# Altium PCB Copy of Auto_USBC_15W_TPS25833Q1.PcbDoc (part 1 of 2)
Units mm, origin at the board's own origin, x right, y up, seen from the top; angles counter-clockwise.
Board outline 23 x 48.5 mm, 4 copper layers (L1_Top, L2_GND, L3_GND, L4_Bottom), stack 1.564 mm thick; 40 components, 24 nets, 137 pads, 9 vias.
Unrouted connection lines stored in the file: 104.
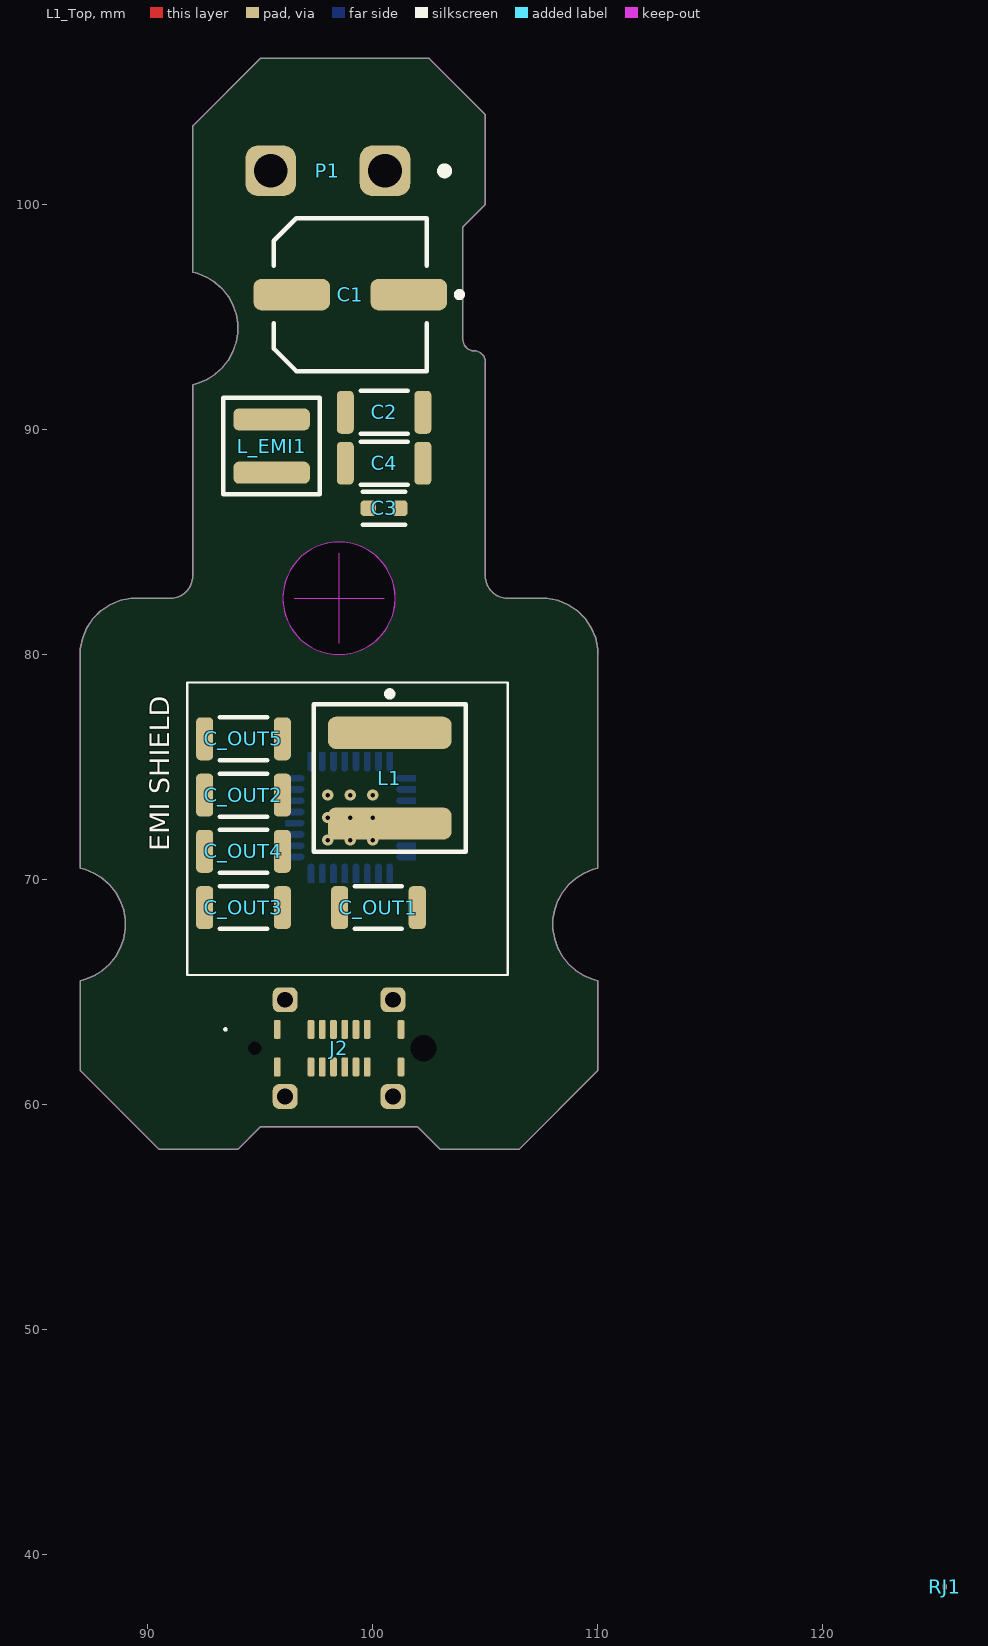
[diagram p0: L1_Top view]
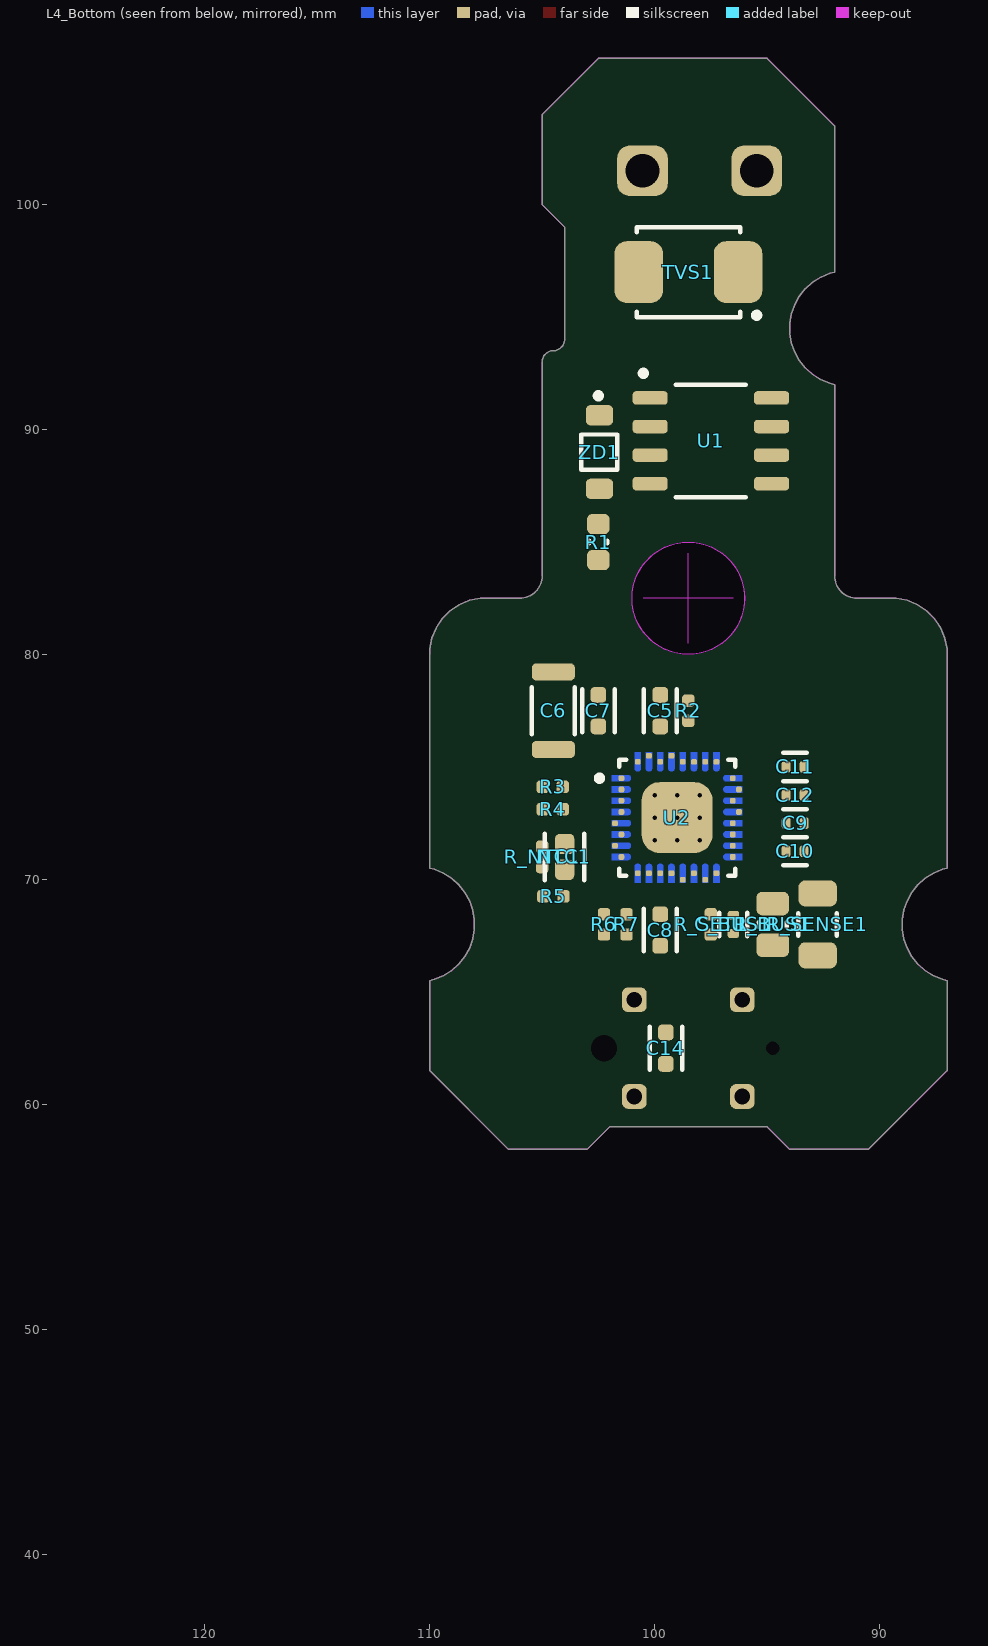
[diagram p1: L4_Bottom view, seen from below]
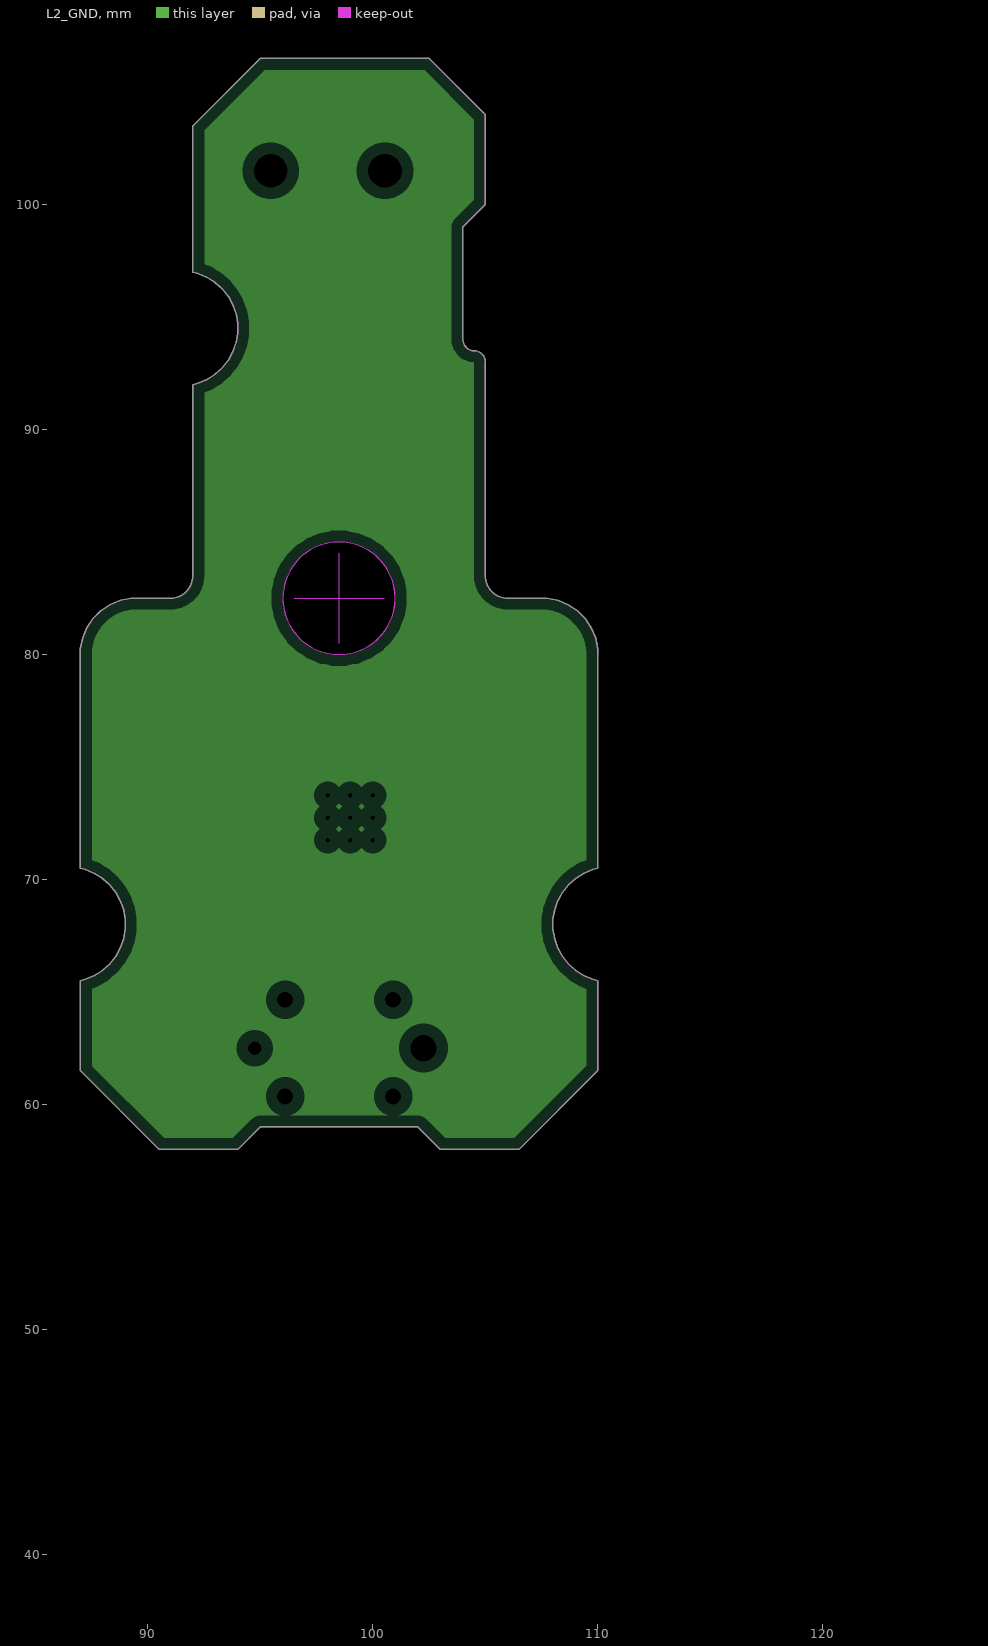
[diagram p2: L2_GND, clearances drawn from the general rule]
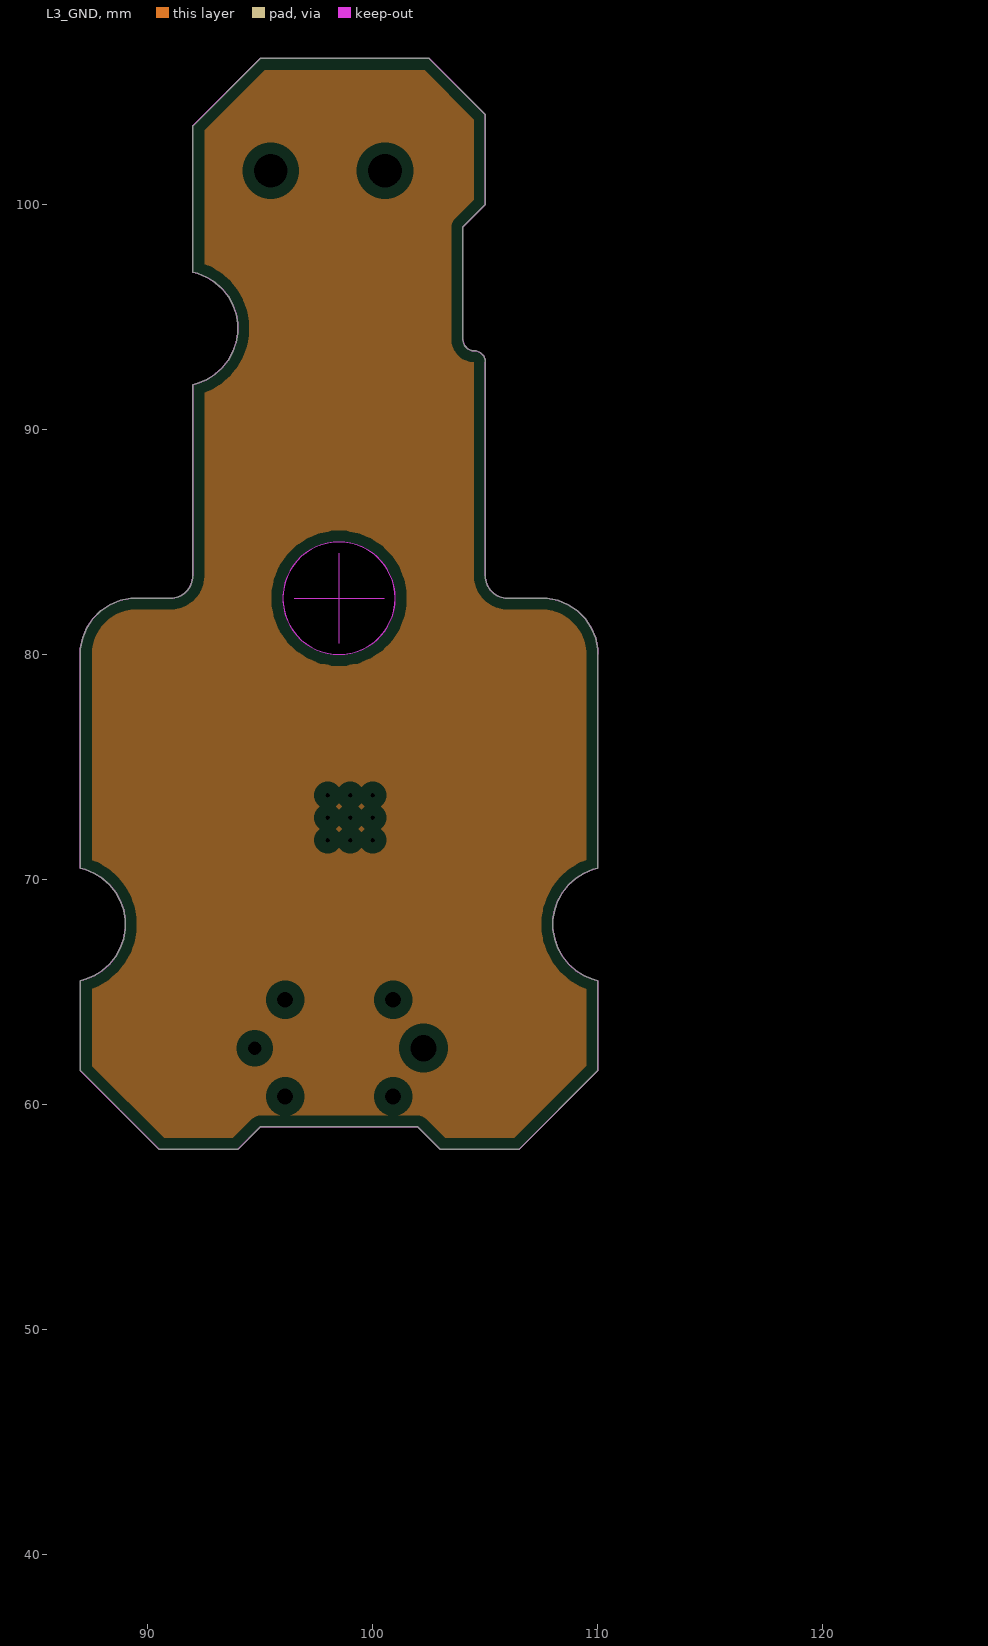
[diagram p3: L3_GND, clearances drawn from the general rule]

## Layer stack, top to bottom
Top Solder: solder mask 0.0305, Solder Resist, Dk 3.8
L1_Top: signal copper 0.035
PP_3313_1: prepreg 0.0994, 3313, Dk 4.1
L2_GND: plane copper 0.0152
Core_1: core 1.265, NP-155F, Dk 4.6
L3_GND: plane copper 0.0152
PP_3313_2: prepreg 0.0994, 3313, Dk 4.1
L4_Bottom: signal copper 0.035
Bottom Solder: solder mask 0.0305, Solder Resist, Dk 3.8

## Board outline
87,61.5 87,65.5 87.209,65.556 87.608,65.72 87.974,65.949 88.296,66.236 88.566,66.573 88.775,66.951 88.918,67.358 88.991,67.784 88.991,68.216 88.918,68.641 88.775,69.049 88.566,69.426 88.296,69.764 87.974,70.051 87.608,70.279 87.209,70.444 87,70.5 87,80 87,80.246 87.096,80.729 87.285,81.184 87.558,81.594 87.906,81.942 88.316,82.215 88.771,82.404 89.254,82.5 89.5,82.5 91,82.5 91.098,82.505 91.29,82.543 91.471,82.618 91.634,82.727 91.773,82.866 91.882,83.029 91.957,83.21 91.995,83.402 92,83.5 92,92 92.209,92.056 92.608,92.22 92.974,92.449 93.296,92.736 93.566,93.073 93.775,93.451 93.918,93.858 93.991,94.284 93.991,94.716 93.918,95.141 93.775,95.549 93.566,95.926 93.296,96.264 92.974,96.551 92.608,96.779 92.209,96.944 92,97 92,103.5 95,106.5 102.5,106.5 105,104 105,100 104,99 104,94 104.01,93.902 104.084,93.722 104.222,93.584 104.402,93.51 104.5,93.5 104.599,93.5 104.783,93.424 104.924,93.283 105,93.099 105,93 105,83.5 105.005,83.402 105.043,83.21 105.118,83.029 105.227,82.866 105.366,82.727 105.529,82.618 105.71,82.543 105.902,82.505 106,82.5 107.5,82.5 107.746,82.5 108.229,82.404 108.684,82.215 109.094,81.942 109.442,81.594 109.715,81.184 109.904,80.729 110,80.246 110,80 110,70.5 109.791,70.444 109.392,70.28 109.026,70.051 108.703,69.764 108.434,69.427 108.224,69.049 108.082,68.642 108.009,68.216 108.009,67.784 108.082,67.359 108.224,66.951 108.434,66.573 108.703,66.236 109.026,65.949 109.392,65.72 109.791,65.556 110,65.5 110,61.5 106.5,58 103,58 102,59 95,59 94,58 90.5,58
cut-out: 96,82.5 ccw(c98.5,82.5) 98.5,80 ccw(c98.5,82.5) 101,82.5 ccw(c98.5,82.5) 98.5,85 ccw(c98.5,82.5)

## Design rules (kind name [scope] priority, off if disabled: settings)
Clearance [All] p1: gap=0.254 ignorepadtopadclearanceinfootprint=FALSE
PlaneClearance [All] p1: clearance=0.508
PlaneConnect [All] p1: planeconnectstyle=Relief reliefexpansion=0.508 reliefentries=4 reliefconductorwidth=0.254 reliefairgap=0.254
PolygonConnect [All] p1: connectstyle=Relief reliefconductorwidth=0.254 reliefentries=4 polygonreliefangle="90 Angle" airgapwidth=0.254
RoutingVias [All] p1: holewidth=0.711 width=1.27 viastyle="Through Hole" minholewidth=0.711 minwidth=1.27 maxholewidth=0.711 maxwidth=1.27
SolderMaskExpansion [All] p1: expansion=0.102 istentingtop=FALSE
Width [All] p1: maxlimit=0.254 minlimit=0.254 preferedwidth=0.254
28 further rules are at their usual default settings.

## Components (designator, comment, footprint, x,y, rotation, side; value= is the part's Value field where it differs from the comment)
C1 "EDH476M050S9HAA" FP-EDH476M050S9HAA-IPC_C 99,96 r180 top
C2 "CGA5L1X7R1H106K160AC" FP-CGA5L-0_3-0_1-IPC_B#1 100.5,90.766 r0 top
C3 "CGA3E2X7R1H104K080AA" FP-CGA3E-0_3-0_1-MFG#1 100.5,86.5 r0 top
C4 "CGA5L1X7R1H106K160AC" FP-CGA5L-0_3-0_1-IPC_B#1 100.5,88.5 r0 top
C5 "CGA3E2X7R1H104K080AA" FP-CGA3E-0_3-0_1-MFG#2 99.75,77.5 r90 bottom
C6 "CGA5L1X7R1H106K160AC" FP-CGA5L-0_3-0_1-IPC_B#2 104.5,77.5 r90 bottom
C7 "CGA3E2X7R1H104K080AA" FP-CGA3E-0_3-0_1-MFG#2 102.5,77.5 r90 bottom
C8 "CGA3E2X7R1H104K080AA" FP-CGA3E-0_3-0_1-MFG#2 99.75,67.75 r270 bottom
C9 "C1005X5R1E224M050BC" FP-CGA2B-MFG 93.75,72.5 r180 bottom value=220nF
C10 "C1005X5R1E224M050BC" FP-CGA2B-MFG 93.75,71.25 r180 bottom value=220nF
C11 "GRT155R61E225KE13D" FP-CGA2B-MFG 93.75,75 r180 bottom value=2.2µF
C12 "CGA2B3X7R1E104K050BB" FP-CGA2B-MFG 93.75,73.75 r180 bottom
C14 "CGA3E2X5R1A105K080AA" FP-CGA3E-0_3-0_1-MFG#2 99.5,62.5 r270 bottom
C_BUS1 "C1005X5R1E224M050BC" FP-CGA2B-MFG 96.5,68 r270 bottom value=220nF
C_OUT1 "GRT31CR61E226KE01L" FP-CGA5L-0_3-0_1-IPC_B#1 100.25,68.75 r0 top value=22µF
C_OUT2 "GRT31CR61E226KE01L" FP-CGA5L-0_3-0_1-IPC_B#1 94.25,73.75 r180 top value=22µF
C_OUT3 "GRT31CR61E226KE01L" FP-CGA5L-0_3-0_1-IPC_B#3 94.25,68.75 r180 top value=22µF
C_OUT4 "GRT31CR61E226KE01L" FP-CGA5L-0_3-0_1-IPC_B#1 94.25,71.25 r180 top value=22µF
C_OUT5 "GRT31CR61E226KE01L" FP-CGA5L-0_3-0_1-IPC_B#1 94.25,76.25 r180 top value=22µF
J2 "219320-0001" 2193200001 98.5,62.5 r0 top
L1 "XAL6060-103MEB" FP-XAL6060-MFG 100.75,74.5 r270 top
L_EMI1 "XAL4020-102MEC" FP-XAL4020-102MEC-MFG 95.5,89.266 r270 top value=1uH
NTC1 "NCU18WF104F6SRB" FP-NCU18-0_15-IPC_C 104,71 r270 bottom
P1 "638207122002" 638263122002 98,101.5 r180 top
R1 "100K 1% 0603(1608)" RESC0603(1608)_N 102.5,85 r90 bottom value=100kΩ
R2 "ERJ2GE0R00X" RESC1005X40X25NL05T05 98.5,77.5 r270 bottom
R3 "" RESC1005X40X25NL05T05 104.53,74.117 r0 bottom value=20kΩ
R4 "" RESC1005X40X25NL05T05 104.53,73.117 r180 bottom value=5kΩ
R5 "ERJ-2RKF4992X" RESC1005X40X25NL05T05 104.5,69.25 r180 bottom value=49.9kΩ
R6 "ERJ2GE0R00X" RESC1005X40X25NL05T05 102.25,68 r90 bottom
R7 "CRCW040211K8FKEE" RESC1005X40X25NL05T05 101.25,68 r90 bottom value=11.8kΩ
R_BUS1 "RK73B2ATTD101J" RESC2013X60X30NL20T20 94.75,68 r90 bottom value=100Ω
R_NTC1 "" RESC1005X40X25NL05T05 105,71 r270 bottom value=10kΩ
R_SENSE1 "CSR1206FK15L0" FP-CSR1206-IPC_B 92.75,68 r270 bottom
R_SET1 "CRCW0402301RFKED" RESC1005X40X25NL05T05 97.5,68 r90 bottom value=301Ω
RJ1 "Net Tie 0.6x1.4mm" SHORT10_8MIL-FP 125.425,38.556 r90 top net-tie
TVS1 "" ONSC-SMB-2-403A-03_H_V 98.5,97 r0 bottom
U1 "SQ4917CEY-T1_GE3" FP-C04-057-SN-MFG 97.5,89.5 r180 bottom
U2 "TPS25833QWRHBRQ1" FP-RHB0032D-MFG 99,72.75 r180 bottom
ZD1 "" ONSC-SOD-123-2-425-04_V 102.45,89 r270 bottom

## Footprints (in the part's own frame and the unit in brackets; to place one, negate y for a bottom-side part, rotate by r counter-clockwise, add the part's x,y. Pads: shape width x height; smd on the part's side, far side on the other; paste and mask are expansions set on the pad)
2193200001 [mm]
  rrect50% 0.3x0.85 smd paste+0: A1(-2.75,0.835) A4(-1.25,0.835) A5(-0.75,0.835) A6(-0.25,0.835) A7(0.25,0.835) A8(0.75,0.835) A9(1.25,0.835) A12(2.75,0.835) B1(2.75,-0.835) B4(1.25,-0.835) B5(0.75,-0.835) B6(0.25,-0.835) B7(-0.25,-0.835) B8(-0.75,-0.835) B9(-1.25,-0.835) B12(-2.75,-0.835)
  rrect50% 0.3x0.3 hole 0.6 unplated: MH1(-3.75,0)
  rrect50% 0.585x0.585 hole 1.17 unplated: MH2(3.75,0)
  rrect50% 1.1x1.1 hole 0.7: MH3(-2.4,2.15) MH4(2.4,2.15) MH5(2.4,-2.15) MH6(-2.4,-2.15)
  silkscreen extent -5.1,0.79 -5,0.88, body extent -4.46,-2.32 4.48,2.28, height 8.81
638263122002 [mm]
  rrect50% 2.25x2.25 hole 1.5: 1(-2.54,0) 2(2.54,0)
  silkscreen extent -5.27,-0.08 -5.11,0.08
FP-C04-057-SN-MFG [mm]
  rrect50% 1.55x0.6 smd: 1(-2.7,1.905) 2(-2.7,0.635) 3(-2.7,-0.635) 4(-2.7,-1.905) 5(2.7,-1.905) 6(2.7,-0.635) 7(2.7,0.635) 8(2.7,1.905)
  silkscreen extent -3.13,-2.5 1.55,3.12, body extent -3,-2.45 3,2.45, height 1.75
FP-CGA2B-MFG [mm]
  rrect50% 0.4x0.5 smd: 1(-0.4,0) 2(0.4,0)
  silkscreen extent -0.53,-0.63 0.53,0.63, body extent -0.5,-0.25 0.5,0.25, height 0.55
FP-CGA3E-0_3-0_1-MFG#1 [mm]
  rrect50% 0.7x0.7 smd paste+0: 1(-0.7,0) 2(0.7,0)
  silkscreen extent -0.95,-0.72 0.95,0.72, body extent -1.15,-0.65 1.15,0.65, height 0.25
FP-CGA3E-0_3-0_1-MFG#2 [mm]
  rrect50% 0.7x0.7 smd: 1(-0.7,0) 2(0.7,0)
  silkscreen extent -0.95,-0.72 0.95,0.72, body extent -0.8,-0.4 0.8,0.4, height 1.1
FP-CGA5L-0_3-0_1-IPC_B#1 [mm]
  rrect50% 0.756x1.906 smd paste+0: 1(-1.725,0) 2(1.725,0)
  silkscreen extent -1.05,-0.95 1.05,0.95, body extent -2.35,-1.2 2.35,1.2, height 0.25
FP-CGA5L-0_3-0_1-IPC_B#2 [mm]
  rrect50% 0.756x1.906 smd: 1(-1.725,0) 2(1.725,0)
  silkscreen extent -1.05,-0.95 1.05,0.95, body extent -1.6,-0.76 1.6,0.84, height 1.9
FP-CGA5L-0_3-0_1-IPC_B#3 [mm]
  rrect50% 0.756x1.906 smd paste+0: 1(-1.725,0)
  rrect50% 0.756x1.906 smd: 2(1.725,0)
  silkscreen extent -1.05,-0.95 1.05,0.95, body extent -2.35,-1.2 2.35,1.2, height 0.25
FP-CSR1206-IPC_B [mil]
  rrect50% 45.5x67.25 smd: 1(-54.18,0) 2(54.18,0)
  silkscreen extent -20,-34 20,34, body extent -60,-31 60,31, height 26
FP-EDH476M050S9HAA-IPC_C [mm]
  rrect50% 3.4x1.4 smd paste+0: 1(-2.6,0) 2(2.6,0)
  silkscreen extent -4.98,-3.4 3.4,3.4, body extent -4.55,-3.65 4.55,3.65, height 0.25
FP-NCU18-0_15-IPC_C [mm]
  rrect50% 0.906x0.858 smd: 1(-0.576,0) 2(0.576,0)
  silkscreen extent -1.03,-0.87 1.03,0.87, body extent -0.8,-0.4 0.8,0.4, height 0.95
FP-RHB0032D-MFG [mm]
  rrect50% 0.252x0.252 smd: 1(-2.475,1.75) 2(-2.475,1.25) 3(-2.475,0.75) 4(-2.475,0.25) 5(-2.76,-0.25) 6(-2.475,-0.75) 7(-2.76,-1.25) 8(-2.475,-1.75) 9(-1.75,-2.475) 10(-1.25,-2.475) 11(-0.75,-2.475) 12(-0.25,-2.475) 13(0.25,-2.76) 14(0.75,-2.475) 15(1.25,-2.76) 16(1.75,-2.475) 17(2.475,-1.75) 18(2.475,-1.25) 19(2.475,-0.75) 20(2.475,-0.25) 21(2.75,0.25) 22(2.475,0.75) 23(2.75,1.25) 24(2.475,1.75) 25(1.75,2.475) 26(1.25,2.475) 27(0.75,2.475) 28(0.25,2.475) 29(-0.25,2.75) 30(-0.75,2.475) 31(-1.25,2.75) 32(-1.75,2.475)
  rrect50% 3.15x3.15 smd: 33(0,0)
  L1_Top region: -2.9,1.89 -2.19,1.89 -2.136,1.879 -2.091,1.849 -2.061,1.804 -2.05,1.75 -2.05,1.75 -2.061,1.696 -2.091,1.651 -2.136,1.621 -2.19,1.61 -2.19,1.61 -2.9,1.61
  L1_Top region: -2.9,1.39 -2.19,1.39 -2.136,1.379 -2.091,1.349 -2.061,1.304 -2.05,1.25 -2.05,1.25 -2.061,1.196 -2.091,1.151 -2.136,1.121 -2.19,1.11 -2.19,1.11 -2.9,1.11
  L1_Top region: -2.9,0.89 -2.19,0.89 -2.136,0.879 -2.091,0.849 -2.061,0.804 -2.05,0.75 -2.05,0.75 -2.061,0.696 -2.091,0.651 -2.136,0.621 -2.19,0.61 -2.19,0.61 -2.9,0.61
  L1_Top region: -2.9,0.39 -2.19,0.39 -2.136,0.379 -2.091,0.349 -2.061,0.304 -2.05,0.25 -2.05,0.25 -2.061,0.196 -2.091,0.151 -2.136,0.121 -2.19,0.11 -2.19,0.11 -2.9,0.11
  L1_Top region: -2.9,-0.11 -2.19,-0.11 -2.136,-0.121 -2.091,-0.151 -2.061,-0.196 -2.05,-0.25 -2.05,-0.25 -2.061,-0.304 -2.091,-0.349 -2.136,-0.379 -2.19,-0.39 -2.19,-0.39 -2.9,-0.39
  L1_Top region: -2.9,-0.61 -2.19,-0.61 -2.136,-0.621 -2.091,-0.651 -2.061,-0.696 -2.05,-0.75 -2.05,-0.75 -2.061,-0.804 -2.091,-0.849 -2.136,-0.879 -2.19,-0.89 -2.19,-0.89 -2.9,-0.89
  L1_Top region: -2.9,-1.11 -2.19,-1.11 -2.136,-1.121 -2.091,-1.151 -2.061,-1.196 -2.05,-1.25 -2.05,-1.25 -2.061,-1.304 -2.091,-1.349 -2.136,-1.379 -2.19,-1.39 -2.19,-1.39 -2.9,-1.39
  L1_Top region: -2.9,-1.61 -2.19,-1.61 -2.136,-1.621 -2.091,-1.651 -2.061,-1.696 -2.05,-1.75 -2.05,-1.75 -2.061,-1.804 -2.091,-1.849 -2.136,-1.879 -2.19,-1.89 -2.19,-1.89 -2.9,-1.89
  L1_Top region: 2.9,-1.89 2.19,-1.89 2.136,-1.879 2.091,-1.849 2.061,-1.804 2.05,-1.75 2.05,-1.75 2.061,-1.696 2.091,-1.651 2.136,-1.621 2.19,-1.61 2.19,-1.61 2.9,-1.61
  L1_Top region: 2.9,-1.39 2.19,-1.39 2.136,-1.379 2.091,-1.349 2.061,-1.304 2.05,-1.25 2.05,-1.25 2.061,-1.196 2.091,-1.151 2.136,-1.121 2.19,-1.11 2.19,-1.11 2.9,-1.11
  L1_Top region: 2.9,-0.89 2.19,-0.89 2.136,-0.879 2.091,-0.849 2.061,-0.804 2.05,-0.75 2.05,-0.75 2.061,-0.696 2.091,-0.651 2.136,-0.621 2.19,-0.61 2.19,-0.61 2.9,-0.61
  L1_Top region: 2.9,-0.39 2.19,-0.39 2.136,-0.379 2.091,-0.349 2.061,-0.304 2.05,-0.25 2.05,-0.25 2.061,-0.196 2.091,-0.151 2.136,-0.121 2.19,-0.11 2.19,-0.11 2.9,-0.11
  L1_Top region: 2.9,0.11 2.19,0.11 2.136,0.121 2.091,0.151 2.061,0.196 2.05,0.25 2.05,0.25 2.061,0.304 2.091,0.349 2.136,0.379 2.19,0.39 2.19,0.39 2.9,0.39
  L1_Top region: 2.9,0.61 2.19,0.61 2.136,0.621 2.091,0.651 2.061,0.696 2.05,0.75 2.05,0.75 2.061,0.804 2.091,0.849 2.136,0.879 2.19,0.89 2.19,0.89 2.9,0.89
  L1_Top region: 2.9,1.11 2.19,1.11 2.136,1.121 2.091,1.151 2.061,1.196 2.05,1.25 2.05,1.25 2.061,1.304 2.091,1.349 2.136,1.379 2.19,1.39 2.19,1.39 2.9,1.39
  L1_Top region: 2.9,1.61 2.19,1.61 2.136,1.621 2.091,1.651 2.061,1.696 2.05,1.75 2.05,1.75 2.061,1.804 2.091,1.849 2.136,1.879 2.19,1.89 2.19,1.89 2.9,1.89
  L1_Top region: -1.89,-2.9 -1.89,-2.19 -1.879,-2.136 -1.849,-2.091 -1.804,-2.061 -1.75,-2.05 -1.75,-2.05 -1.696,-2.061 -1.651,-2.091 -1.621,-2.136 -1.61,-2.19 -1.61,-2.19 -1.61,-2.9
  L1_Top region: -1.39,-2.9 -1.39,-2.19 -1.379,-2.136 -1.349,-2.091 -1.304,-2.061 -1.25,-2.05 -1.25,-2.05 -1.196,-2.061 -1.151,-2.091 -1.121,-2.136 -1.11,-2.19 -1.11,-2.19 -1.11,-2.9
  L1_Top region: -0.89,-2.9 -0.89,-2.19 -0.879,-2.136 -0.849,-2.091 -0.804,-2.061 -0.75,-2.05 -0.75,-2.05 -0.696,-2.061 -0.651,-2.091 -0.621,-2.136 -0.61,-2.19 -0.61,-2.19 -0.61,-2.9
  L1_Top region: -0.39,-2.9 -0.39,-2.19 -0.379,-2.136 -0.349,-2.091 -0.304,-2.061 -0.25,-2.05 -0.25,-2.05 -0.196,-2.061 -0.151,-2.091 -0.121,-2.136 -0.11,-2.19 -0.11,-2.19 -0.11,-2.9
  L1_Top region: 0.11,-2.9 0.11,-2.19 0.121,-2.136 0.151,-2.091 0.196,-2.061 0.25,-2.05 0.25,-2.05 0.304,-2.061 0.349,-2.091 0.379,-2.136 0.39,-2.19 0.39,-2.19 0.39,-2.9
  L1_Top region: 0.61,-2.9 0.61,-2.19 0.621,-2.136 0.651,-2.091 0.696,-2.061 0.75,-2.05 0.75,-2.05 0.804,-2.061 0.849,-2.091 0.879,-2.136 0.89,-2.19 0.89,-2.19 0.89,-2.9
  L1_Top region: 1.11,-2.9 1.11,-2.19 1.121,-2.136 1.151,-2.091 1.196,-2.061 1.25,-2.05 1.25,-2.05 1.304,-2.061 1.349,-2.091 1.379,-2.136 1.39,-2.19 1.39,-2.19 1.39,-2.9
  L1_Top region: 1.61,-2.9 1.61,-2.19 1.621,-2.136 1.651,-2.091 1.696,-2.061 1.75,-2.05 1.75,-2.05 1.804,-2.061 1.849,-2.091 1.879,-2.136 1.89,-2.19 1.89,-2.19 1.89,-2.9
  L1_Top region: 1.89,2.9 1.89,2.19 1.879,2.136 1.849,2.091 1.804,2.061 1.75,2.05 1.75,2.05 1.696,2.061 1.651,2.091 1.621,2.136 1.61,2.19 1.61,2.19 1.61,2.9
  L1_Top region: 1.39,2.9 1.39,2.19 1.379,2.136 1.349,2.091 1.304,2.061 1.25,2.05 1.25,2.05 1.196,2.061 1.151,2.091 1.121,2.136 1.11,2.19 1.11,2.19 1.11,2.9
  L1_Top region: 0.89,2.9 0.89,2.19 0.879,2.136 0.849,2.091 0.804,2.061 0.75,2.05 0.75,2.05 0.696,2.061 0.651,2.091 0.621,2.136 0.61,2.19 0.61,2.19 0.61,2.9
  L1_Top region: 0.39,2.9 0.39,2.19 0.379,2.136 0.349,2.091 0.304,2.061 0.25,2.05 0.25,2.05 0.196,2.061 0.151,2.091 0.121,2.136 0.11,2.19 0.11,2.19 0.11,2.9
  L1_Top region: -0.11,2.9 -0.11,2.19 -0.121,2.136 -0.151,2.091 -0.196,2.061 -0.25,2.05 -0.25,2.05 -0.304,2.061 -0.349,2.091 -0.379,2.136 -0.39,2.19 -0.39,2.19 -0.39,2.9
  L1_Top region: -0.61,2.9 -0.61,2.19 -0.621,2.136 -0.651,2.091 -0.696,2.061 -0.75,2.05 -0.75,2.05 -0.804,2.061 -0.849,2.091 -0.879,2.136 -0.89,2.19 -0.89,2.19 -0.89,2.9
  L1_Top region: -1.11,2.9 -1.11,2.19 -1.121,2.136 -1.151,2.091 -1.196,2.061 -1.25,2.05 -1.25,2.05 -1.304,2.061 -1.349,2.091 -1.379,2.136 -1.39,2.19 -1.39,2.19 -1.39,2.9
  L1_Top region: -1.61,2.9 -1.61,2.19 -1.621,2.136 -1.651,2.091 -1.696,2.061 -1.75,2.05 -1.75,2.05 -1.804,2.061 -1.849,2.091 -1.879,2.136 -1.89,2.19 -1.89,2.19 -1.89,2.9
  silkscreen extent -3.58,-2.58 2.58,2.58, body extent -2.5,-2.5 2.5,2.5, height 1
FP-XAL4020-102MEC-MFG [mm]
  rrect50% 0.98x3.4 smd paste+0: 1(-1.185,0) 2(1.185,0)
  silkscreen extent -2.15,-2.15 2.15,2.15, body extent -2.25,-2.25 2.25,2.25, height 0.25
FP-XAL6060-MFG [mm]
  rrect50% 1.43x5.5 smd paste+0: 1(-2.02,0) 2(2.02,0)
  silkscreen extent -3.87,-3.38 3.28,3.38, body extent -3.38,-3.48 3.38,3.48, height 0.25
ONSC-SMB-2-403A-03_H_V [mm] "Molded, 2-Leads, Body 4.6x3.95mm"
  rrect50% 2.159x2.743 smd: 1(-2.21,0) 2(2.21,0)
  silkscreen extent -3.16,-2 2.3,2.05, body extent -2.3,-1.97 2.3,1.97, height 2.42
ONSC-SOD-123-2-425-04_V [mm] "SOD, 2-Leads, Body 2.69x1.6mm"
  rrect50% 0.91x1.22 smd: 1(-1.635,0) 2(1.635,0)
  silkscreen extent -2.62,-0.8 0.78,0.8, body extent -1.35,-0.8 1.35,0.8, height 1.35
RESC0603(1608)_N [mm] "Chip Resistor, Body 1.6x0.8mm, IPC Medium Density"
  rrect50% 0.9x1 smd: 1(-0.8,0) 2(0.8,0)
  silkscreen extent -0.05,-0.4 0.05,0.4, body extent -0.85,-0.47 0.85,0.47, height 0.6
RESC1005X40X25NL05T05 [mm] "Chip Resistor, 2-Leads, Body 1.05x0.55mm, IPC Medium Density"
  rrect50% 0.55x0.55 smd: 1(-0.45,0) 2(0.45,0)
  body extent -0.53,-0.28 0.53,0.28, height 0.4
RESC2013X60X30NL20T20 [mm] "Chip Resistor, 2-Leads, Body 2.00x1.25mm, IPC Medium Density"
  rrect50% 1.05x1.45 smd: 1(-0.925,0) 2(0.925,0)
  silkscreen extent -0.1,-0.63 0.1,0.63, body extent -1.1,-0.72 1.1,0.72, height 0.6
SHORT10_8MIL-FP [mil]
  rrect50% 8x8 smd paste-39.37: 1(-1,0) 2(1,0)

## Part data
C1: library part CMP-03015-000011-1, "CAP ALUM 47UF 20% 50V SMD", Capacitance=47uF, RoHS Compliant=Yes
C2 C4 C6: library part CMP-08246-001891-1, "Cap Ceramic 10uF 50V X7R 10% Pad SMD 1206 +125°C Automotive T/R", Capacitance=10uF, Case Code (Imperial)=1206, Case Code (Metric)=3216, Max Operating Temperature=125°C, Min Operating Temperature=-55°C, Ratings=AEC-Q200, Tolerance=10%, Voltage Rating=50V, Case/Package=1206, Mount="Surface Mount", Packaging="Tape and Reel"
C3 C5 C7 C8: library part CMP-2000-07546-2, "Cap Ceramic 100nF 50V X7R 10% Pad SMD 0603 +125°C Automotive T/R", Capacitance=100nF, Case Code (Imperial)=0603, Case Code (Metric)=1608, Dielectric=X7R, Max Operating Temperature=125°C, Min Operating Temperature=-55°C, Package Quantity=1, Ratings=AEC-Q200, Tolerance=10%, Voltage=50V, Case/Package=0603, Composition=Ceramic, Depth=0.8mm, Height=0.8mm, Lead Free="Lead Free", Length=1.6mm, Mount="Surface Mount", Packaging="Tape and Reel", Radiation Hardening=No, REACH SVHC="No SVHC", Termination=SMD/SMT, Thickness=0.035inch, Voltage Rating=50V, Voltage Rating (DC)=50V, Weight=7.1E-05oz, Width=0.8mm
C9 C10 C_BUS1: library part CMP-2000-06086-2, "25V 220nF X5R 卤20% 0402 Multilayer Ceramic Capacitors MLCC - SMD/SMT ROHS", Case Code (Imperial)=0402, Case Code (Metric)=1005, Dielectric=X5R, Dielectric Material=Ceramic, Manufacturer=TDK, Manufacturer Lifecycle Status="PRODUCTION (NOT RECOMMENDED FOR NEW DESIGN)", Max Operating Temperature=85°C, Min Operating Temperature=-55°C, Tolerance=20%, Voltage Rating=25V, Case/Package=0402, Category="Ceramic Capacitors", China RoHS=Compliant, ComponentLink1Description=https://datasheet.octopart.com:443/C1005X5R1E224M050BC-TDK-datasheet-175423548.pdf?src-supplier=IHS, ComponentLink1URL=https://datasheet.octopart.com:443/C1005X5R1E224M050BC-TDK-datasheet-175423548.pdf?src-supplier=IHS, ComponentLink2Description=https://datasheet.octopart.com:443/C1005X5R1E224M050BC-TDK-datasheet-151546523.pdf?src-supplier=TDK, ComponentLink2URL=https://datasheet.octopart.com:443/C1005X5R1E224M050BC-TDK-datasheet-151546523.pdf?src-supplier=TDK, ComponentLink3Description=https://datasheet.octopart.com/C1005X5R1E224M050BC-TDK-datasheet-41194876.pdf, ComponentLink3URL=https://datasheet.octopart.com/C1005X5R1E224M050BC-TDK-datasheet-41194876.pdf, ComponentLink4Description=https://datasheet.octopart.com/C-Series-Ceramic-Chip-Capacitors-TDK-datasheet-family-84.pdf, ComponentLink4URL=https://datasheet.octopart.com/C-Series-Ceramic-Chip-Capacitors-TDK-datasheet-family-84.pdf, ComponentLink5Description=https://datasheet.octopart.com:443/C1005X5R1E224M050BC-TDK-datasheet-82475248.pdf?src-supplier=Newark, ComponentLink5URL=https://datasheet.octopart.com:443/C1005X5R1E224M050BC-TDK-datasheet-82475248.pdf?src-supplier=Newark, ComponentLink6Description=https://datasheet.octopart.com:443/C1005X5R1E224M050BC-TDK-datasheet-13444418.pdf?src-supplier=Future+Electronics, ComponentLink6URL=https://datasheet.octopart.com:443/C1005X5R1E224M050BC-TDK-datasheet-13444418.pdf?src-supplier=Future+Electronics, ComponentLink7Description=https://datasheet.octopart.com:443/C1005X5R1E224M050BC-TDK-datasheet-17817446.pdf?src-supplier=Future+Electronics, ComponentLink7URL=https://datasheet.octopart.com:443/C1005X5R1E224M050BC-TDK-datasheet-17817446.pdf?src-supplier=Future+Electronics, ComponentLink8Description=https://datasheet.octopart.com:443/C1005X5R1E224M050BC-TDK-datasheet-10921857.pdf?src-supplier=Electro+Sonic, ComponentLink8URL=https://datasheet.octopart.com:443/C1005X5R1E224M050BC-TDK-datasheet-10921857.pdf?src-supplier=Electro+Sonic, ComponentLink9Description=http://sigma.octopart.com:80/rohs_certificate/C-Series-Ceramic-Chip-Capacitors-TDK-family-108.pdf?src-supplier=Compliance+Statements, ComponentLink9URL=http://sigma.octopart.com:80/rohs_certificate/C-Series-Ceramic-Chip-Capacitors-TDK-family-108.pdf?src-supplier=Compliance+Statements, Composition=Ceramic, Depth=500µm, Export Control Classification Number (ECCN) Code=EAR99, Harmonized Tariff Schedule (HTS) Code=8532.24.00.20, Height=500µm, Introduction Date=2012-08-21, Lead Free="Lead Free", Length=1mm, Lifecycle Status=NRND, Manufacturer Part Number=C1005X5R1E224M050BC, Material=Ceramic, Max Length=1.05mm, Max Width=550µm, Min Length=950µm, Min Width=450µm, Mounting Technology="Surface Mount", Number of Terminals=2, Pricing="10000=0.0212 (USD)", REACH SVHC=Unaffected, RoHS=Compliant, Supplier=Avnet, Supplier Part Number=C1005X5R1E224M050BC, Termination=SMD/SMT, Voltage Rating (DC)=25V, Weight=652.039032µg, Width=500µm
C11: library part CMP-2000-06086-2, "25V 2.2uF X5R ±10% 0402 Multilayer Ceramic Capacitors MLCC - SMD/SMT ROHS", Case Code (Imperial)=0402, Case Code (Metric)=1005, Dielectric=X5R, Dielectric Material=Ceramic, Manufacturer=Murata, Manufacturer Lifecycle Status="IN PRODUCTION", Max Operating Temperature=85°C, Min Operating Temperature=-55°C, Ratings=AEC-Q200, Tolerance=10%, Voltage Rating=25V, Case/Package=0402, Category="Ceramic Capacitors", ComponentLink1Description=https://datasheet.octopart.com:443/GRT155R61E225KE13D-Murata-datasheet-149523572.pdf?src-supplier=Farnell, ComponentLink1URL=https://datasheet.octopart.com:443/GRT155R61E225KE13D-Murata-datasheet-149523572.pdf?src-supplier=Farnell, ComponentLink2Description=https://datasheet.octopart.com:443/GRT155R61E225KE13D-Murata-datasheet-67697706.pdf?src-supplier=Newark, ComponentLink2URL=https://datasheet.octopart.com:443/GRT155R61E225KE13D-Murata-datasheet-67697706.pdf?src-supplier=Newark, ComponentLink3Description=https://datasheet.octopart.com:443/GRT155R61E225KE13D-Murata-datasheet-141283924.pdf?src-supplier=Geoflip, ComponentLink3URL=https://datasheet.octopart.com:443/GRT155R61E225KE13D-Murata-datasheet-141283924.pdf?src-supplier=Geoflip, ComponentLink4Description=https://datasheet.octopart.com:443/GRT155R61E225KE13D-Murata-datasheet-178522875.pdf?src-supplier=Arrow.cn, ComponentLink4URL=https://datasheet.octopart.com:443/GRT155R61E225KE13D-Murata-datasheet-178522875.pdf?src-supplier=Arrow.cn, ComponentLink5Description=https://datasheet.octopart.com:443/GRT155R61E225KE13D-Murata-datasheet-165579666.pdf?src-supplier=TME, ComponentLink5URL=https://datasheet.octopart.com:443/GRT155R61E225KE13D-Murata-datasheet-165579666.pdf?src-supplier=TME, ComponentLink6Description=https://datasheet.octopart.com:443/GRT155R61E225KE13D-Murata-datasheet-140711002.pdf?src-supplier=Ciiva, ComponentLink6URL=https://datasheet.octopart.com:443/GRT155R61E225KE13D-Murata-datasheet-140711002.pdf?src-supplier=Ciiva, ComponentLink7Description=https://datasheet.octopart.com:443/GRT155R61E225KE13D-Murata-datasheet-138748731.pdf?src-supplier=Ciiva, ComponentLink7URL=https://datasheet.octopart.com:443/GRT155R61E225KE13D-Murata-datasheet-138748731.pdf?src-supplier=Ciiva, ComponentLink8Description=https://datasheet.octopart.com:443/GRT155R61E225KE13D-Murata-datasheet-82944872.pdf?src-supplier=Future+Electronics, ComponentLink8URL=https://datasheet.octopart.com:443/GRT155R61E225KE13D-Murata-datasheet-82944872.pdf?src-supplier=Future+Electronics, ComponentLink9Description=http://sigma.octopart.com:80/reach_statement/Murata-company-16.pdf?src-supplier=Compliance+Statements, ComponentLink9URL=http://sigma.octopart.com:80/reach_statement/Murata-company-16.pdf?src-supplier=Compliance+Statements, Export Control Classification Number (ECCN) Code=EAR99, Harmonized Tariff Schedule (HTS) Code=8532.24.00.20, Height=500µm, Introduction Date=2016-01-27, Length=1mm, Lifecycle Status=Production, Manufacturer Part Number=GRT155R61E225KE13D, Material=Ceramic, Mounting Technology="Surface Mount", Number of Terminals=2, Packaging="Cut Tape", Pricing="10000=0.168 (USD)", REACH SVHC=Unaffected, RoHS=Compliant, Schedule B="8532240020, 8532240020|8532240020, 8532240020|8532240020|8532240020, 8532240020|8532240020|8532240020|8532240020", Stock=170000, Supplier="Future Electronics", Supplier Part Number=GRT155R61E225KE13D, Voltage Rating (DC)=25V, Width=500µm
C12: library part CMP-2000-06086-2, "Cap Ceramic 100nF 25V X7R 10% Pad SMD 0402 +125°C Automotive T/R", Capacitance=100nF, Case Code (Imperial)=0402, Case Code (Metric)=1005, Dielectric=X7R, Max Operating Temperature=125°C, Min Operating Temperature=-55°C, Package Quantity=1, Ratings=AEC-Q200, Tolerance=10%, Voltage=25V, Case/Package=0402, Composition=Ceramic, Depth=0.5mm, Height=0.5mm, Lead Free="Lead Free", Length=1mm, Mount="Surface Mount", Packaging="Tape and Reel", REACH SVHC="No SVHC", Termination=SMD/SMT, Thickness=0.022inch, Voltage Rating=25V, Voltage Rating (DC)=25V, Weight=2.3E-05oz, Width=0.02inch
C14: library part CMP-08246-000763-1, "Cap Ceramic 1uF 10V X5R 10% Pad SMD 0603 +85°C Automotive T/R", Capacitance=1uF, Case Code (Imperial)=0603, Case Code (Metric)=1608, Dielectric=X5R, Max Operating Temperature=85°C, Min Operating Temperature=-55°C, Package Quantity=4000, Ratings=AEC-Q200, Tolerance=10%, Voltage Rating=10V, Case/Package=0603, Height=0.8mm, Length=0.063inch, Mount="Surface Mount", Packaging="Tape and Reel", Thickness=0.035inch, Voltage Rating (DC)=10V, Weight=7.1E-05oz, Width=0.031inch
C_OUT1 C_OUT2 C_OUT3 C_OUT4 C_OUT5: library part CMP-08246-001891-1, "CAP CER 22UF 25V X5R 1206 / 22 µF ±10% 25V Ceramic Capacitor X5R 1206 (3216 Metric)", Case Code (Imperial)=1206, Case Code (Metric)=3216, Dielectric=X5R, Dielectric Material=Ceramic, Manufacturer=Murata, Manufacturer Lifecycle Status=NRND, Max Operating Temperature=85°C, Min Operating Temperature=-55°C, Ratings=AEC-Q200, Tolerance=10%, Voltage Rating=25V, Case/Package=1206, Category="Ceramic Capacitors", ComponentLink1Description=https://datasheet.octopart.com:443/GRT31CR61E226KE01L-Murata-datasheet-67697882.pdf?src-supplier=HQonline, ComponentLink1URL=https://datasheet.octopart.com:443/GRT31CR61E226KE01L-Murata-datasheet-67697882.pdf?src-supplier=HQonline, ComponentLink2Description=https://datasheet.octopart.com:443/GRT31CR61E226KE01L-Murata-datasheet-141285200.pdf?src-supplier=Geoflip, ComponentLink2URL=https://datasheet.octopart.com:443/GRT31CR61E226KE01L-Murata-datasheet-141285200.pdf?src-supplier=Geoflip, ComponentLink3Description=https://datasheet.octopart.com:443/GRT31CR61E226KE01L-Murata-datasheet-140711510.pdf?src-supplier=Ciiva, ComponentLink3URL=https://datasheet.octopart.com:443/GRT31CR61E226KE01L-Murata-datasheet-140711510.pdf?src-supplier=Ciiva, ComponentLink4Description=https://datasheet.octopart.com:443/GRT31CR61E226KE01L-Murata-datasheet-138749569.pdf?src-supplier=Ciiva, ComponentLink4URL=https://datasheet.octopart.com:443/GRT31CR61E226KE01L-Murata-datasheet-138749569.pdf?src-supplier=Ciiva, ComponentLink5Description=https://datasheet.octopart.com:443/GRT31CR61E226KE01L-Murata-datasheet-128593529.pdf?src-supplier=X-ON, ComponentLink5URL=https://datasheet.octopart.com:443/GRT31CR61E226KE01L-Murata-datasheet-128593529.pdf?src-supplier=X-ON, ComponentLink6Description=http://sigma.octopart.com:80/reach_statement/Murata-company-16.pdf?src-supplier=Compliance+Statements, ComponentLink6URL=http://sigma.octopart.com:80/reach_statement/Murata-company-16.pdf?src-supplier=Compliance+Statements, Export Control Classification Number (ECCN) Code=EAR99, Harmonized Tariff Schedule (HTS) Code=8532.24.00.20, Height=1.6mm, Introduction Date=2016-01-27, Length=3.2mm, Lifecycle Status=NRND, Manufacturer Part Number=GRT31CR61E226KE01L, Mounting Technology="Surface Mount", Number of Terminals=2, Packaging="Cut Tape", Pricing="44=1.6387, 100=1.5267 (USD)", REACH SVHC=Unaffected, RoHS=Compliant, Schedule B="8532240020, 8532240020|8532240020|8532240020|8532240020|8532240020", Stock=257, Supplier="Arrow Electronics", Supplier Part Number=GRT31CR61E226KE01L, Voltage Rating (DC)=25V, Width=1.6mm
J2: "Universal Serial Bus (USB) Shielded I/O Receptacle, Type C, Vertical, Surface Mount, Height 8.8mm, 16 Circuits, Gold (Au) Flash Plating", Manufacturer_Name=Molex, Mouser Part Number=538-219320-0001, Datasheet Link=https://www.molex.com/content/dam/molex/molex-dot-com/products/automated/en-us/salesdrawingpdf/219/219320/2193200001_sd.pdf?inline, Geometry.Height=9.05mm, Manufacturer_Part_Number=219320-0001, Mouser Price/Stock=https://www.mouser.co.uk/ProductDetail/Molex/219320-0001?qs=rQFj71Wb1eXha8qVBIXu3A%3D%3D
L1: library part CMP-11268-000112-1, "Power inductor, shielded,10uH 20% tol, 29.82mOhms, SMT, RoHS, Halogen Free, AEC - Q200", DC Resistance (DCR)=29.82mR, Inductance=10uH, Max DC Current=7A, Max Operating Temperature=125°C, Min Operating Temperature=-40°C, Package Quantity=21, Self Resonant Frequency=14MHz, Test Frequency=100kHz, Tolerance=20%, Core Material=Composite, Height=6.1mm, Lead Free="Contains Lead", Length=6.76mm, Packaging="Tape and Reel", RoHS Compliant=Yes, Series=XAL6060, Shielding=Shielded, Termination=SMD/SMT, Width=6.56mm
L_EMI1: library part CMP-11268-000037-1, "Fixed Inductors 1uH 20% 9.6A 14.60mOhms AEC-Q200", Ambient Temperature Range High=+125°C, Ambient Temperature Range Low=-40°C, Inductance=1uH, Manufacturer=Coilcraft, Package=0, Rms Current=9.6A, Saturation Current=8.7A, Self Resonant Frequency=79MHz, Series Resistance=14.6mΩ, Test Frequency=1MHz, Tolerance=20%, Automotive=Yes, Automotive Grade="Grade 1", Category=Ind, ComponentLink2Description=Datasheet, ComponentLink2URL=https://www.coilcraft.com/pdfs/xal4000.pdf, Composition=Wirewound, Core Material=Composite, Device Class L1="Passive Components", Device Class L2=Inductors, Device Class L3="Fixed Inductors", Height=2.1mm, Lead Free=Yes, Manufacturer Part Number=XAL4020-102MEC, Mouser Description="Power inductor, shielded, 20% tol, SMT, RoHS, halogen f", Octopart=https://octopart.com/xal4020-102mec-coilcraft-13142161, RoHS=TRUE, Shielding=true, Standoff Height=0.1mm
NTC1: library part CMP-06022-000152-2, "THERMISTOR NTC", Case Code (Imperial)=0603, Case Code (Metric)=1608, Max Operating Temperature=150°C, Min Operating Temperature=-40°C, Resistance=100k, REACH SVHC="No SVHC", RoHS Compliant=Yes
P1: library part CMP-03913-107328823-2, "Conn, R/A Hdr, Stamped Tab, 2P, 5.08Mm Rohs Compliant: Yes", Gender=Male
R1: library part CMP-1012-00736-1, "100K 0.1W 1% 0603 (1608 Metric)  SMD", Case-EIA=0603, Case-Metric=1608, Power="0.1 W", Tolerance="1 %", Technology=SMT
R2 R6: library part CMP-2000-07451-1, "Chip Resistor, 0 Ohm, 0.1 W, -55 to 155 degC, 0402 (1005 Metric), RoHS, Tape and Reel", Case Code (Imperial)=0402, Case Code (Metric)=1005, Manufacturer=Panasonic, Max Operating Temperature=155degC, Max Power Dissipation=100mW, Min Operating Temperature=-55degC, Package Description="2-Pin Surface Mount Device, Body 1 x 0.5 mm", Package Quantity=1, Package Reference=402, Resistance="0 Ω", Temperature Coefficient=600ppm/��C, Tolerance=5%, Voltage Rating=50V, Case/Package=0402, Composition=ThickFilm, Contact Plating=Tin, Datasheet URL=https://industrial.panasonic.com/cdbs/www-data/pdf/RDA0000/AOA0000C301.pdf, Datasheet Version=03/2015, Depth=0.5mm, Height=0.35mm, Lead Free=LeadFree, Length=1mm, Manufacturer URL=http://www.panasonic.com/, Military Standard=Not, Mount=SurfaceMount, Mounting Technology=SurfaceMount, Number of Terminations=2, Packaging=TapeandReel, Power Rating=100mW, Radiation Hardening=No, REACH SVHC=NoSVHC, RoHSCompliant=True, Termination=SMD/SMT, Voltage Rating (DC)=50V, Width=0.02inch
R3: library part CMP-2000-07451-1, Case/Package=0402, Manufacturer="Yageo Group", Manufacturer Part Number=AC0402FR-7W20KL, Max Operating Temperature=155°C, Min Operating Temperature=-55°C, Power Rating=125mW, Ratings=AEC-Q200, Temperature Coefficient=100ppm/°C, Tolerance=1%, Voltage Rating=50V, Working Voltage=75V, Category="Chip SMD Resistors", China RoHS=Non-Compliant, ComponentLink1Description=https://datasheet.octopart.com:443/AC0402FR-7W20KL-Yageo-datasheet-182189377.pdf?src-supplier=IHS, ComponentLink1URL=https://datasheet.octopart.com:443/AC0402FR-7W20KL-Yageo-datasheet-182189377.pdf?src-supplier=IHS, ComponentLink2Description=https://datasheet.octopart.com:443/AC0402FR-7W20KL-Yageo-datasheet-83209224.pdf?src-supplier=Upverter, ComponentLink2URL=https://datasheet.octopart.com:443/AC0402FR-7W20KL-Yageo-datasheet-83209224.pdf?src-supplier=Upverter, ComponentLink3Description=https://datasheet.octopart.com:443/AC0402FR-7W20KL-Yageo-datasheet-178509465.pdf?src-supplier=Farnell, ComponentLink3URL=https://datasheet.octopart.com:443/AC0402FR-7W20KL-Yageo-datasheet-178509465.pdf?src-supplier=Farnell, ComponentLink4Description=https://datasheet.octopart.com:443/AC0402FR-7W20KL-Yageo-datasheet-166720450.pdf?src-supplier=Future+Electronics, ComponentLink4URL=https://datasheet.octopart.com:443/AC0402FR-7W20KL-Yageo-datasheet-166720450.pdf?src-supplier=Future+Electronics, ComponentLink5Description=https://datasheet.octopart.com:443/AC0402FR-7W20KL-Yageo-datasheet-151884373.pdf?src-supplier=Future+Electronics, ComponentLink5URL=https://datasheet.octopart.com:443/AC0402FR-7W20KL-Yageo-datasheet-151884373.pdf?src-supplier=Future+Electronics, ComponentLink6Description=https://datasheet.octopart.com:443/AC0402FR-7W20KL-Yageo-Group-datasheet-159083007.pdf?src-supplier=HQonline, ComponentLink6URL=https://datasheet.octopart.com:443/AC0402FR-7W20KL-Yageo-Group-datasheet-159083007.pdf?src-supplier=HQonline, ComponentLink7Description=https://datasheet.octopart.com/AC0402FR-7W20KL-Yageo-datasheet-12512238.pdf, ComponentLink7URL=https://datasheet.octopart.com/AC0402FR-7W20KL-Yageo-datasheet-12512238.pdf, ComponentLink8Description=http://sigma.octopart.com:80/conflict_mineral_statement/Yageo-company-3.pdf?src-supplier=Compliance+Statements, ComponentLink8URL=http://sigma.octopart.com:80/conflict_mineral_statement/Yageo-company-3.pdf?src-supplier=Compliance+Statements, ComponentLink9Description=http://sigma.octopart.com:80/rohs_statement/Yageo-company-2.pdf?src-supplier=Compliance+Statements, ComponentLink9URL=http://sigma.octopart.com:80/rohs_statement/Yageo-company-2.pdf?src-supplier=Compliance+Statements, Composition="Thick Film", Country of Origin="Mainland China, Taiwan", Export Control Classification Number (ECCN) Code=EAR99, Harmonized Tariff Schedule (HTS) Code=8533.21.00.30, Height=320µm, Introduction Date=2017-06-20, Length=1mm, Lifecycle Status=Production, Mounting Technology="Surface Mount", Number of Terminals=2, Packaging="Tape & Reel", Pricing="10000=0.0077, 30000=0.0075, 50000=0.0074, 100000=0.0073, 200000=0.0071 (USD)", REACH SVHC=Unaffected, RoHS=Compliant, Stock=120000, Supplier="Future Electronics", Supplier Part Number=AC0402FR-7W20KL, Width=500µm
R4: library part CMP-2000-07451-1, Case/Package=0402, Manufacturer="Yageo Group", Manufacturer Part Number=RC0402FR-075KL, Max Operating Temperature=155°C, Max Power Dissipation=63mW, Min Operating Temperature=-55°C, Power Rating=62.5mW, Temperature Coefficient=100ppm/°C, Tolerance=1%, Voltage Rating=50V, Category="Chip SMD Resistors", China RoHS=Non-Compliant, ComponentLink1Description=https://datasheet.octopart.com:443/RC0402FR-075KL-Yageo-datasheet-127823281.pdf?src-supplier=Upverter, ComponentLink1URL=https://datasheet.octopart.com:443/RC0402FR-075KL-Yageo-datasheet-127823281.pdf?src-supplier=Upverter, ComponentLink2Description=https://datasheet.octopart.com:443/RC0402FR-075KL-Yageo-datasheet-137700087.pdf?src-supplier=IHS, ComponentLink2URL=https://datasheet.octopart.com:443/RC0402FR-075KL-Yageo-datasheet-137700087.pdf?src-supplier=IHS, ComponentLink3Description=https://datasheet.octopart.com:443/RC0402FR-075KL-Yageo-Group-datasheet-176638170.pdf?src-supplier=Future+Electronics, ComponentLink3URL=https://datasheet.octopart.com:443/RC0402FR-075KL-Yageo-Group-datasheet-176638170.pdf?src-supplier=Future+Electronics, ComponentLink4Description=https://datasheet.octopart.com:443/RC0402FR-075KL-Yageo-datasheet-164759695.pdf?src-supplier=Future+Electronics, ComponentLink4URL=https://datasheet.octopart.com:443/RC0402FR-075KL-Yageo-datasheet-164759695.pdf?src-supplier=Future+Electronics, ComponentLink5Description=https://datasheet.octopart.com:443/RC0402FR-075KL-Yageo-datasheet-175887523.pdf?src-supplier=Newark, ComponentLink5URL=https://datasheet.octopart.com:443/RC0402FR-075KL-Yageo-datasheet-175887523.pdf?src-supplier=Newark, ComponentLink6Description=https://datasheet.octopart.com/RC0402FR-075KL-Yageo-datasheet-73766026.pdf, ComponentLink6URL=https://datasheet.octopart.com/RC0402FR-075KL-Yageo-datasheet-73766026.pdf, ComponentLink7Description=http://sigma.octopart.com:80/conflict_mineral_statement/Yageo-company-3.pdf?src-supplier=Compliance+Statements, ComponentLink7URL=http://sigma.octopart.com:80/conflict_mineral_statement/Yageo-company-3.pdf?src-supplier=Compliance+Statements, ComponentLink8Description=http://sigma.octopart.com:80/rohs_statement/Yageo-company-2.pdf?src-supplier=Compliance+Statements, ComponentLink8URL=http://sigma.octopart.com:80/rohs_statement/Yageo-company-2.pdf?src-supplier=Compliance+Statements, Composition="Thick Film", Country of Origin="Mainland China, Taiwan", Export Control Classification Number (ECCN) Code=EAR99, Features="Moisture Resistant", Harmonized Tariff Schedule (HTS) Code=8533.21.00.30, Height=350µm, Introduction Date=2011-11-17, Length=1mm, Lifecycle Status=Production, Mounting Technology="Surface Mount", Number of Terminals=2, Number of Terminations=2, Pricing="1=0.101, 25=0.011, 100=0.010, 250=0.009, 500=0.008, 1000=0.007, 2500=0.005 (USD)", REACH SVHC=Unaffected, RoHS=Compliant, Schedule B="8533210045, 8533210045|8533210045|8533210045|8533210045|8533210045", Stock=9552, Supplier=Avnet, Supplier Part Number=RC0402FR-075KL, Width=500µm, Working Voltage=50V
R5: library part CMP-2000-07451-1, Case Code (Imperial)=0402, Manufacturer=Panasonic, Manufacturer Lifecycle Status=ACTIVE, Manufacturer Part Number=ERJ2RKF4992X, Max Operating Temperature=155°C, Max Power Dissipation=100mW, Min Operating Temperature=-55°C, Ratings=AEC-Q200, Temperature Coefficient=100ppm/°C, Tolerance=1%, Voltage Rating=50V, Case/Package=0402, Category="Chip SMD Resistors", China RoHS=Non-Compliant, ComponentLink1Description=https://datasheet.octopart.com:443/ERJ2RKF4992X-Panasonic-datasheet-82288794.pdf?src-supplier=Upverter, ComponentLink1URL=https://datasheet.octopart.com:443/ERJ2RKF4992X-Panasonic-datasheet-82288794.pdf?src-supplier=Upverter, ComponentLink2Description=https://datasheet.octopart.com:443/ERJ2RKF4992X-Panasonic-datasheet-13266541.pdf?src-supplier=RS+(Formerly+Allied+Electronics), ComponentLink2URL=https://datasheet.octopart.com:443/ERJ2RKF4992X-Panasonic-datasheet-13266541.pdf?src-supplier=RS+(Formerly+Allied+Electronics), ComponentLink3Description=https://datasheet.octopart.com:443/ERJ2RKF4992X-Panasonic-datasheet-10025800.pdf?src-supplier=Future+Electronics, ComponentLink3URL=https://datasheet.octopart.com:443/ERJ2RKF4992X-Panasonic-datasheet-10025800.pdf?src-supplier=Future+Electronics, ComponentLink4Description=https://datasheet.octopart.com:443/ERJ2RKF4992X-Panasonic-datasheet-8853621.pdf?src-supplier=Future+Electronics, ComponentLink4URL=https://datasheet.octopart.com:443/ERJ2RKF4992X-Panasonic-datasheet-8853621.pdf?src-supplier=Future+Electronics, ComponentLink5Description=https://datasheet.octopart.com:443/ERJ2RKF4992X-Panasonic-datasheet-5313456.pdf?src-supplier=Future+Electronics, ComponentLink5URL=https://datasheet.octopart.com:443/ERJ2RKF4992X-Panasonic-datasheet-5313456.pdf?src-supplier=Future+Electronics, ComponentLink6Description=https://datasheet.octopart.com:443/ERJ2RKF4992X-Panasonic-datasheet-48891056.pdf?src-supplier=Newark, ComponentLink6URL=https://datasheet.octopart.com:443/ERJ2RKF4992X-Panasonic-datasheet-48891056.pdf?src-supplier=Newark, ComponentLink7Description=https://datasheet.octopart.com:443/ERJ2RKF4992X-Panasonic-datasheet-136608610.pdf?src-supplier=Newark, ComponentLink7URL=https://datasheet.octopart.com:443/ERJ2RKF4992X-Panasonic-datasheet-136608610.pdf?src-supplier=Newark, ComponentLink8Description=https://datasheet.octopart.com:443/ERJ-2RKF4992X-Panasonic-datasheet-154766169.pdf?src-supplier=JRH+Electronics, ComponentLink8URL=https://datasheet.octopart.com:443/ERJ-2RKF4992X-Panasonic-datasheet-154766169.pdf?src-supplier=JRH+Electronics, ComponentLink9Description=https://datasheet.octopart.com:443/ERJ2RKF4992X-Panasonic-datasheet-164353789.pdf?src-supplier=HQonline, ComponentLink9URL=https://datasheet.octopart.com:443/ERJ2RKF4992X-Panasonic-datasheet-164353789.pdf?src-supplier=HQonline, ComponentLink10Description=https://datasheet.octopart.com:443/ERJ2RKF4992X-Panasonic-datasheet-188592431.pdf?src-supplier=TME, ComponentLink10URL=https://datasheet.octopart.com:443/ERJ2RKF4992X-Panasonic-datasheet-188592431.pdf?src-supplier=TME, ComponentLink11Description=https://datasheet.octopart.com/ERJ2RKF4992X-Panasonic-datasheet-78375410.pdf, ComponentLink11URL=https://datasheet.octopart.com/ERJ2RKF4992X-Panasonic-datasheet-78375410.pdf, ComponentLink12Description=https://datasheet.octopart.com:443/ERJ-2RKF4992X-Panasonic---ECG-datasheet-15994758.pdf?src-supplier=Farnell, ComponentLink12URL=https://datasheet.octopart.com:443/ERJ-2RKF4992X-Panasonic---ECG-datasheet-15994758.pdf?src-supplier=Farnell, ComponentLink13Description=https://datasheet.octopart.com:443/ERJ2RKF4992X-Panasonic-datasheet-7538305.pdf?src-supplier=Jameco+(USA), ComponentLink13URL=https://datasheet.octopart.com:443/ERJ2RKF4992X-Panasonic-datasheet-7538305.pdf?src-supplier=Jameco+(USA), ComponentLink14Description=https://datasheet.octopart.com:443/ERJ-2RKF4992X-Panasonic-datasheet-118621.pdf?src-supplier=DigiKey, ComponentLink14URL=https://datasheet.octopart.com:443/ERJ-2RKF4992X-Panasonic-datasheet-118621.pdf?src-supplier=DigiKey, ComponentLink15Description=https://datasheet.octopart.com:443/ERJ-2RKF4992X-Panasonic-datasheet-41391857.pdf?src-supplier=Electro+Sonic, ComponentLink15URL=https://datasheet.octopart.com:443/ERJ-2RKF4992X-Panasonic-datasheet-41391857.pdf?src-supplier=Electro+Sonic, Composition="Thick Film", Contact Plating=Tin, Country of Origin="Japan, Mainland China", Depth=500µm, Export Control Classification Number (ECCN) Code=EAR99, Features="Automotive AEC-Q200", Harmonized Tariff Schedule (HTS) Code=8533.21.00.30, Height=350µm, Introduction Date=2004-02-02, Lead Free="Lead Free", Length=1mm, Lifecycle Status=Production, Military Standard=Not, Mounting Technology="Surface Mount", Number of Terminals=2, Number of Terminations=2, Packaging="Cut Tape", Part Series="Precision Thick Film Chip Resistors", Power Rating=100mW, Pricing="10000=0.0105, 30000=0.0102, 50000=0.0099, 150000=0.0097, 250000=0.0094 (USD)", Radiation Hardening=No, REACH SVHC=Unaffected, RoHS=Compliant, Schedule B="8533210045, 8533210045|8533210045|8533210045|8533210045|8533210045", Stock=150000, Supplier="Future Electronics", Supplier Part Number=ERJ-2RKF4992X, Termination=SMD/SMT, Voltage Rating (DC)=50V, Width=500µm, Working Voltage=50V
R7: library part CMP-2000-07451-1, Case/Package=0402, Manufacturer=Vishay, Max Operating Temperature=155°C, Max Power Dissipation=63mW, Min Operating Temperature=-55°C, Ratings=AEC-Q200, Temperature Coefficient=100ppm/°C, Tolerance=1%, Voltage Rating=50V, Category="Chip SMD Resistors", China RoHS=Non-Compliant, ComponentLink1Description=https://datasheet.octopart.com:443/CRCW040211K8FKEE-Vishay-datasheet-175423584.pdf?src-supplier=IHS, ComponentLink1URL=https://datasheet.octopart.com:443/CRCW040211K8FKEE-Vishay-datasheet-175423584.pdf?src-supplier=IHS, ComponentLink2Description=https://datasheet.octopart.com:443/CRCW040211K8FKEE-Vishay-datasheet-62316123.pdf?src-supplier=JRH+Electronics, ComponentLink2URL=https://datasheet.octopart.com:443/CRCW040211K8FKEE-Vishay-datasheet-62316123.pdf?src-supplier=JRH+Electronics, ComponentLink3Description=https://datasheet.octopart.com:443/CRCW040211K8FKEE-Vishay-datasheet-193386866.pdf?src-supplier=JRH+Electronics, ComponentLink3URL=https://datasheet.octopart.com:443/CRCW040211K8FKEE-Vishay-datasheet-193386866.pdf?src-supplier=JRH+Electronics, ComponentLink4Description=http://sigma.octopart.com:80/rohs_statement/Vishay-company-15.pdf?src-supplier=Compliance+Statements, ComponentLink4URL=http://sigma.octopart.com:80/rohs_statement/Vishay-company-15.pdf?src-supplier=Compliance+Statements, Composition="Thick Film", Contact Plating=Tin, Country of Origin="Israel, Taiwan", Export Control Classification Number (ECCN) Code=EAR99, Features="Automotive AEC-Q200", Harmonized Tariff Schedule (HTS) Code=8533.21.00.30, Height=350µm, Introduction Date=2005-12-02, Lead Free="Lead Free", Length=1mm, Lifecycle Status=Production, Manufacturer Part Number=CRCW040211K8FKEE, Mounting Technology="Surface Mount", Number of Terminals=2, Number of Terminations=2, Packaging="Tape & Reel (TR)", Power Rating=63mW, Pricing="50000=0.00784, 100000=0.0078, 200000=0.00776, 400000=0.00772, 800000=0.00768 (USD)", Radiation Hardening=No, REACH SVHC=Unaffected, RoHS=Compliant, Schedule B="8533210045, 8533210045|8533210045|8533210045|8533210045|8533210045|8533210045|8533210045|8533210045|8533210045|8533210045|8533210045|8533210045|8533210045|8533210045|8533210045|8533210045|8533210045|8533210045|8533210045|8533210045|8533210045|8533210045|8533210045|85", Stock=50000, Supplier=Avnet, Supplier Part Number=CRCW040211K8FKEE, Width=500µm, Working Voltage=50V
R_BUS1: library part CMP-2001-04655-1, Manufacturer="KOA Speer", Part Number=RK73B2ATTD101J
R_NTC1: library part CMP-2000-07451-1, Case/Package=0402, Manufacturer="KOA Speer", Manufacturer Part Number=RK73H1ETTPD1002F, Max Operating Temperature=155°C, Min Operating Temperature=-55°C, Power Rating=100mW, Ratings=AEC-Q200, Supplier Part Number=660-RK73H1ETTPD1002F, Temperature Coefficient=100ppm/°C, Tolerance=1%, Voltage Rating=75V, Voltage Rating (DC)=50V, Category="Chip SMD Resistors", China RoHS=Non-Compliant, ComponentLink1Description=https://sigma.octopart.com:443/138820520/technical_drawing/KOA-Speer-RK73H1ETTPD1002F.pdf?src-supplier=Upverter, ComponentLink1URL=https://sigma.octopart.com:443/138820520/technical_drawing/KOA-Speer-RK73H1ETTPD1002F.pdf?src-supplier=Upverter, ComponentLink2Description=https://datasheet.octopart.com:443/RK73H1ETTPD1002F-KOA-Speer-datasheet-141253609.pdf?src-supplier=Upverter, ComponentLink2URL=https://datasheet.octopart.com:443/RK73H1ETTPD1002F-KOA-Speer-datasheet-141253609.pdf?src-supplier=Upverter, ComponentLink3Description=https://datasheet.octopart.com:443/RK73H1ETTPD1002F-KOA-Speer-datasheet-182143587.pdf?src-supplier=IHS, ComponentLink3URL=https://datasheet.octopart.com:443/RK73H1ETTPD1002F-KOA-Speer-datasheet-182143587.pdf?src-supplier=IHS, ComponentLink4Description=https://datasheet.octopart.com/RK73H-%7C-Flat-Chip-Resistors-%28Precision-Grade%29-KOA-Speer-datasheet-family-85.pdf, ComponentLink4URL=https://datasheet.octopart.com/RK73H-%7C-Flat-Chip-Resistors-%28Precision-Grade%29-KOA-Speer-datasheet-family-85.pdf, ComponentLink5Description=https://datasheet.octopart.com/RK73H1ETTPD1002F-KOA-Speer-datasheet-11590619.pdf, ComponentLink5URL=https://datasheet.octopart.com/RK73H1ETTPD1002F-KOA-Speer-datasheet-11590619.pdf, ComponentLink6Description=https://datasheet.octopart.com:443/RK73H1ETTPD1002F-KOA-Speer-datasheet-109211.pdf?src-supplier=Garrett, ComponentLink6URL=https://datasheet.octopart.com:443/RK73H1ETTPD1002F-KOA-Speer-datasheet-109211.pdf?src-supplier=Garrett, ComponentLink7Description=http://sigma.octopart.com:80/rohs_certificate/RK73H-%7C-Flat-Chip-Resistors-%28Precision-Grade%29-KOA-Speer-family-91.pdf?src-supplier=Compliance+Statements, ComponentLink7URL=http://sigma.octopart.com:80/rohs_certificate/RK73H-%7C-Flat-Chip-Resistors-%28Precision-Grade%29-KOA-Speer-family-91.pdf?src-supplier=Compliance+Statements, Composition="Thick Film", Country of Origin=Japan, Export Control Classification Number (ECCN) Code=EAR99, Harmonized Tariff Schedule (HTS) Code=8533.21.00.30, Height=350µm, Introduction Date=2009-12-23, Lead Free="Lead Free", Length=1mm, Lifecycle Status=Production, Mounting Technology="Surface Mount", Number of Terminals=2, Pricing="1=0.1, 10=0.017, 50=0.017, 100=0.014, 1000=0.008, 10000=0.004 (USD)", REACH SVHC=Unaffected, RoHS=Compliant, Schedule B="8533210045, 8533210045|8533210045, 8533210045|8533210045|8533210045, 8533210045|8533210045|8533210045|8533210045", Stock=21454, Supplier=Mouser, Width=500µm, Working Voltage=75V
R_SENSE1: library part CMP-26527-006578-1, "General Purpose Thick Film Chip Resistor, 1206, 15mΩ, 1%, 0.5W", Case Code (Imperial)=1206, Case Code (Metric)=3216, Max Operating Temperature=155°C, Max Power Dissipation=500mW, Min Operating Temperature=-55°C, Resistance=15mR, Resistor Type="Thick Film", Temperature Coefficient=100ppm/°C, Tolerance=1%, Case/Package=1206, Contact Plating=Tin, Height=0.026inch, Lead Free="Lead Free", Length=0.12inch, Mount="Surface Mount", Number of Terminations=2, Packaging="Tape and Reel", Radiation Hardening=No, RoHS Compliant=Yes, Series=CSR, Width=0.061inch